# Altium PCB PCB1.PcbDoc
Units mm, origin at the board's own origin, x right, y up, seen from the top; angles counter-clockwise.
Board outline 30 x 30 mm, 2 copper layers (Top Layer, Bottom Layer); 11 components, 7 nets, 26 pads, 31 vias.
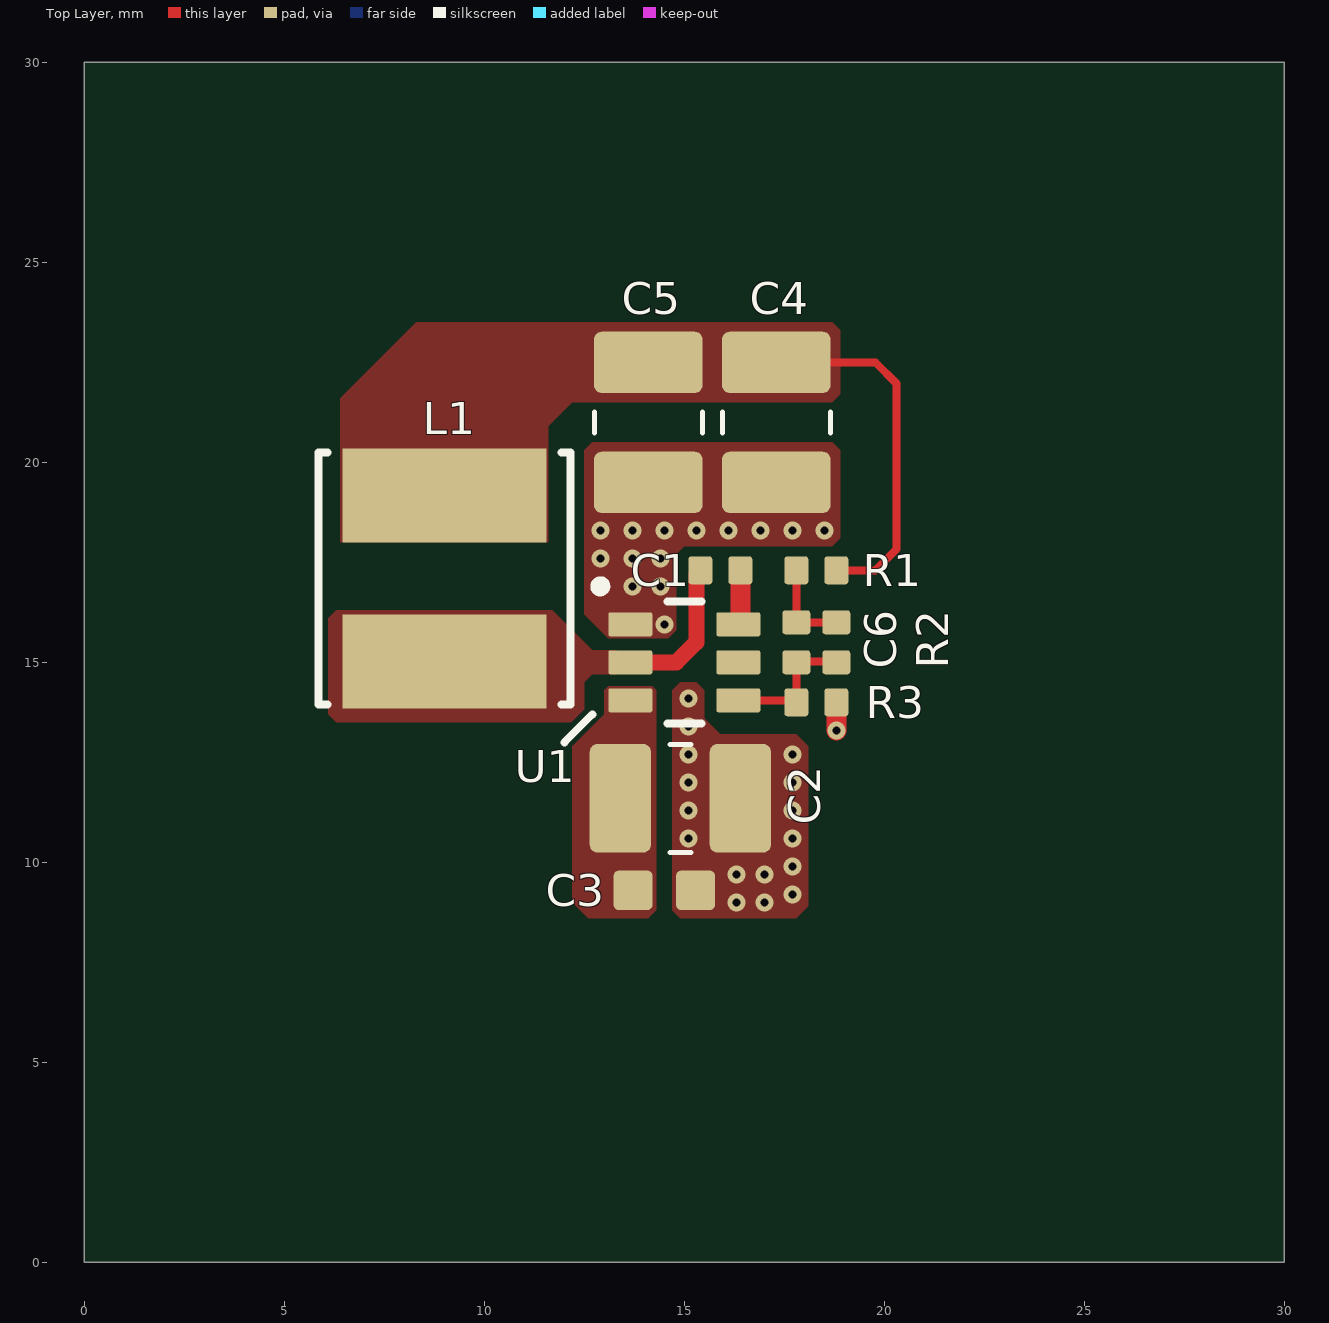
[diagram p0: Top Layer view]
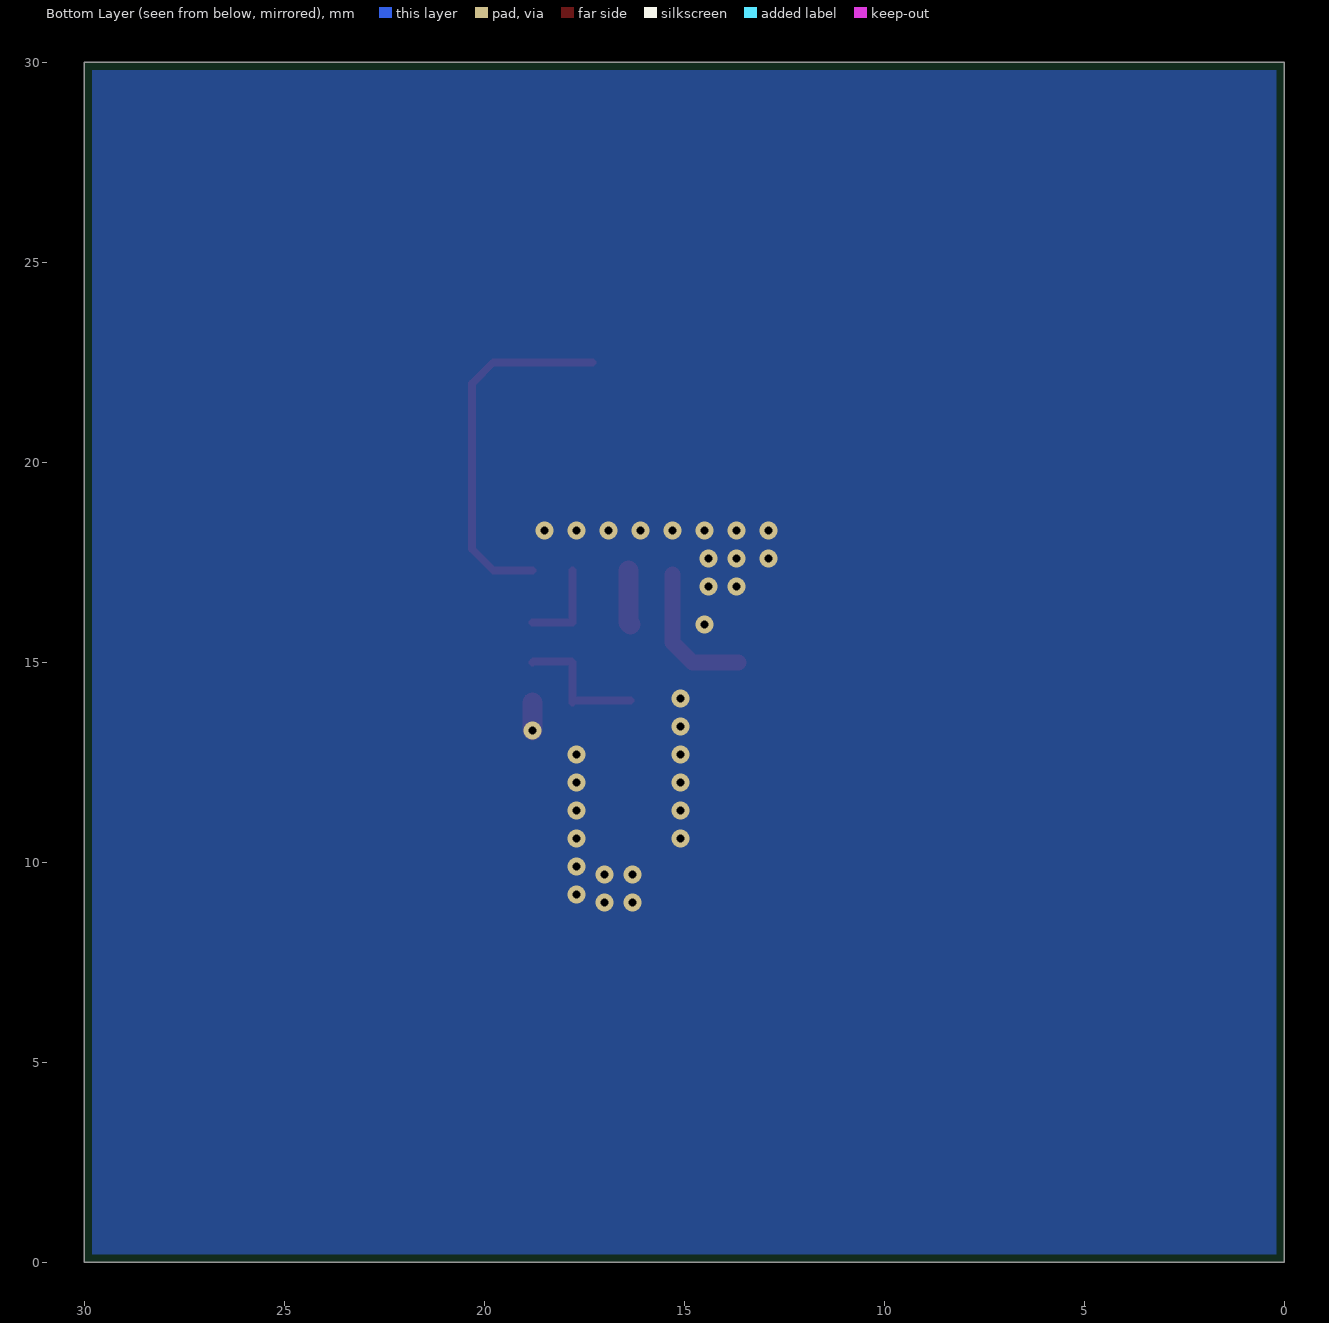
[diagram p1: Bottom Layer view, seen from below]
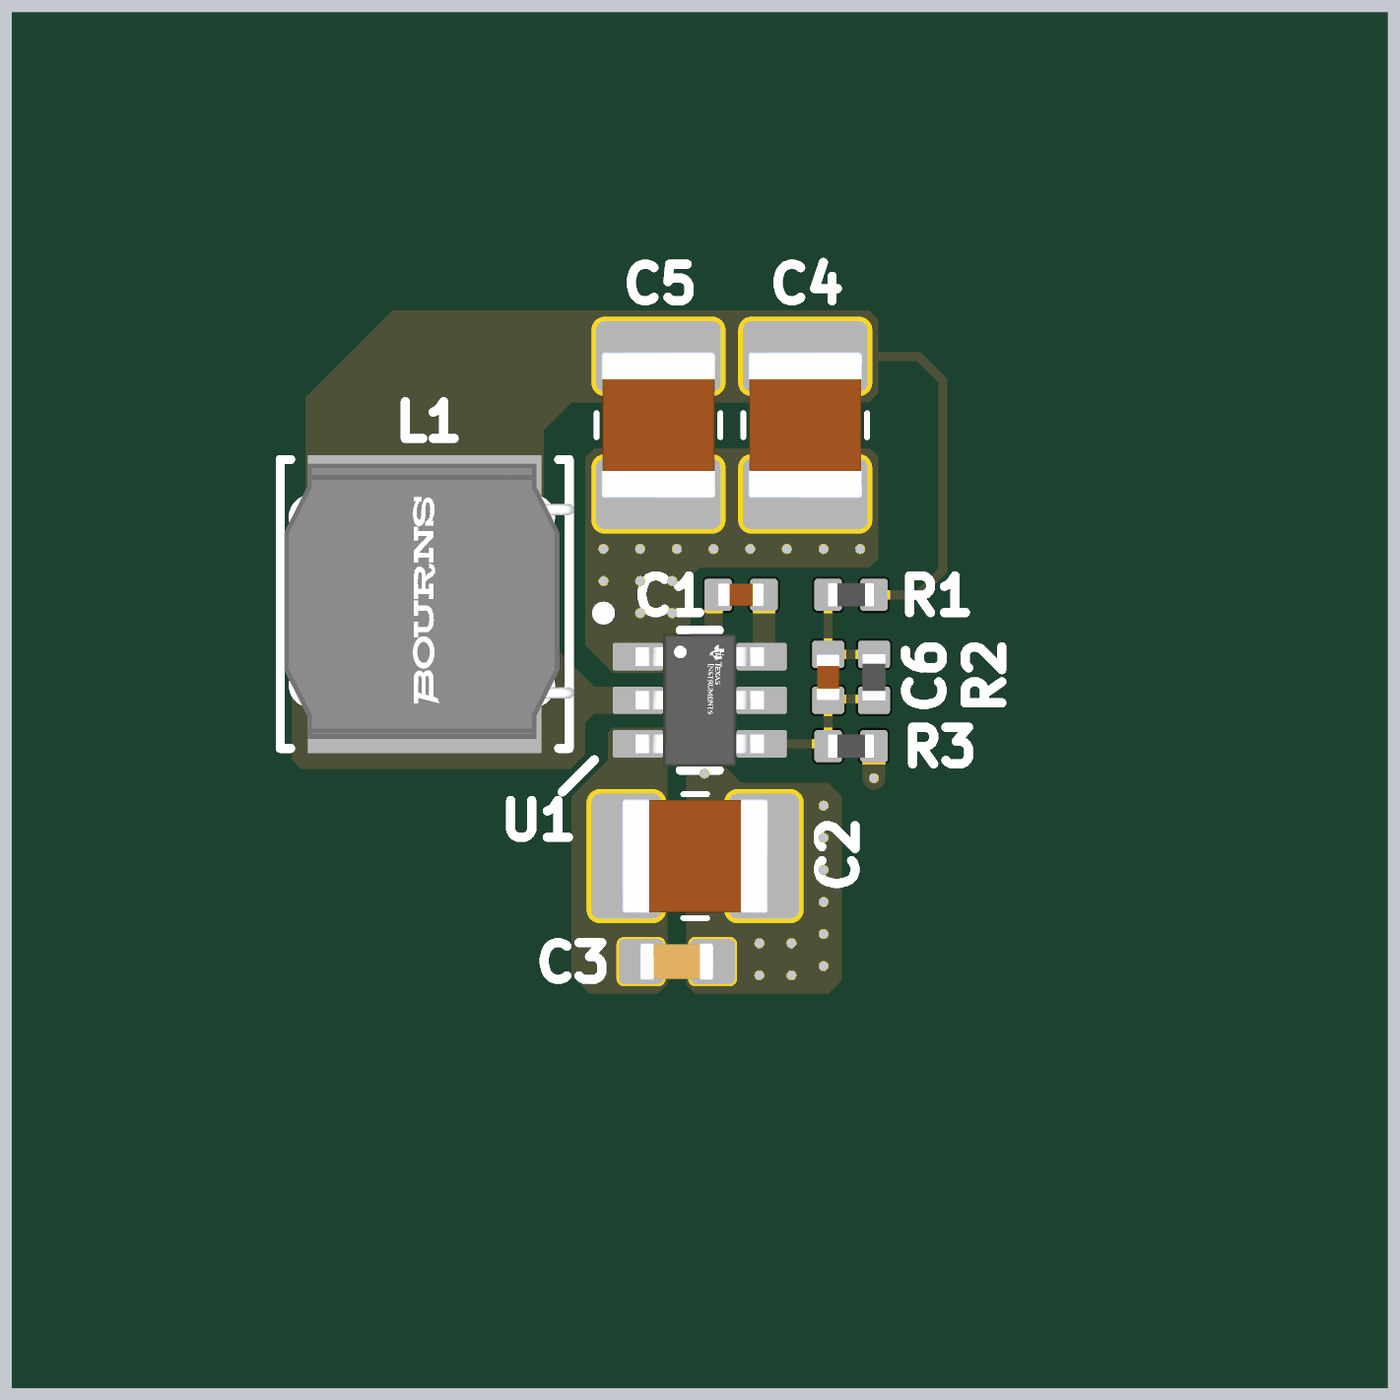
[diagram p2: 3D render of the assembled board from above, using the file's embedded part models]

## Layer stack, top to bottom
Top Solder: solder mask 0.0102, Solder Resist, Dk 3.5
Top Layer: signal copper 0.0356
Dielectric 1: dielectric 0.32, FR-4, Dk 4.8
Bottom Layer: signal copper 0.0356
Bottom Solder: solder mask 0.0102, Solder Resist, Dk 3.5

## Board outline
0,0 0,30 30,30 30,0

## Design rules (kind name [scope] priority, off if disabled: settings)
BoardOutlineClearance [All] p1: gap=0.2 ignorepadtopadclearanceinfootprint=FALSE
Clearance [All] p1: gap=0.127 ignorepadtopadclearanceinfootprint=FALSE except(0.102: Arc-Text Track-Text SMDPad-Text THPad-Text Fill-Text Poly-Text Region-Text Text-Text; 0.12: Arc-Arc Arc-Track Track-Track; 0.15: Arc-SMDPad Arc-Via Track-SMDPad Track-Via SMDPad-SMDPad SMDPad-THPad THPad-THPad Fill-Fill Fill-Poly Fill-Region Poly-Poly Poly-Region Region-Region; 0.2: Arc-THPad Track-THPad; 0.25: Arc-Hole Track-Hole SMDPad-Hole THPad-Fill THPad-Poly THPad-Region THPad-Hole Via-Hole Fill-Hole Poly-Hole Region-Hole Text-Hole)
DiffPairsRouting [InDifferentialPairClass('USBCONN_DIFF')] p1: maxlimit=0.127 minlimit=0.127 mostfreqgap=0.127 toplayer_minwidth=0.2 toplayer_maxwidth=0.2 toplayer_prefwidth=0.2 bottomlayer_minwidth=0.2 bottomlayer_maxwidth=0.2 bottomlayer_prefwidth=0.2 impedanceprofiledriven=TRUE maxuncoupledlength=12.7
HoleSize [All] p1: absolutevalues=TRUE maxlimit=6.3 minlimit=0.2 maxpercent=80.000 minpercent=20.000
HoleToHoleClearance [All] p1: gap=0.25 allowstackedmicrovias=FALSE
MinimumAnnularRing [All] p1: minimumring=0.12
MinimumSolderMaskSliver [All] p1: minsoldermaskwidth=0.1
PlaneClearance [All] p1: clearance=0.15
PlaneConnect PlaneConnectPowerPads [InPadClass('PowerPads')] p1: planeconnectstyle=Direct reliefexpansion=0.508 reliefentries=4 reliefconductorwidth=0.254 reliefairgap=0.254
PlaneConnect [All] p2: planeconnectstyle=Direct reliefexpansion=0.3 reliefentries=4 reliefconductorwidth=1 reliefairgap=0.102
PolygonConnect PolygonConnectPowerPads [All vs (InPadClass('PowerPads'))] p1: connectstyle=Direct reliefconductorwidth=0.254 reliefentries=4 polygonreliefangle="90 Angle" airgapwidth=0.254
PolygonConnect [All] p2: connectstyle=Direct reliefconductorwidth=0.5 reliefentries=4 polygonreliefangle="90 Angle" airgapwidth=0.102
RoutingVias [All] p1: holewidth=0.2 width=0.45 viastyle="Through Hole" minholewidth=0.2 minwidth=0.45 maxholewidth=0.2 maxwidth=0.45
SilkToSilkClearance [All] p1: silktosilkclearance=0
SilkToSolderMaskClearance [IsPad] p1: minsilkscreentomaskgap=0.102 clearancetoexposedcopper=TRUE
SolderMaskExpansion SolderMaskExpansion_1 [IsVia] p1: expansion=0.102 istentingtop=TRUE
SolderMaskExpansion [All] p2: expansion=0.075 istentingtop=FALSE
Width [All] p1: maxlimit=0.8 minlimit=0.102 preferedwidth=0.2 minimp=50.000000 maximp=50.000000 favimp=50.000000
22 further rules are at their usual default settings.

## Components (designator, comment, footprint, x,y, rotation, side; value= is the part's Value field where it differs from the comment)
C1 "100nF" 0402_Cap 15.9,17.3 r0 top
C2 "10uF" 1210_CAP 14.9,11.6 r180 top
C3 "100nF" 0603_CAP 14.5,9.3 r180 top
C4 "22uF" 1210_CAP 17.3,21 r90 top
C5 "22uF" 1210_CAP 14.1,21 r90 top
C6 "75pF" 0402_Cap 17.8,15.5 r90 top
L1 "10uH" FP-SRN6045TA-MFG 9,17.1 r90 top
R1 "0R" 0402_RES 18.3,17.3 r0 top
R2 "100K" 0402_RES 18.8,15.5 r90 top
R3 "13K3" 0402_RES 18.3,14 r180 top
U1 "TPS54302DDCR" FP-DDC0006A-MFG 15,15 r0 top

## Footprints (in the part's own frame and the unit in brackets; to place one, negate y for a bottom-side part, rotate by r counter-clockwise, add the part's x,y. Pads: shape width x height; smd on the part's side, far side on the other; paste and mask are expansions set on the pad)
0402_Cap [mm]
  rrect25% 0.6x0.7 smd paste+0 mask+0.051: 1(-0.5,0) 2(0.5,0)
  body extent -0.5,-0.25 0.5,0.25, height 0.55
0402_RES [mm]
  rrect25% 0.6x0.7 smd paste+0 mask+0.051: 1(-0.5,0) 2(0.5,0)
  body extent -0.5,-0.25 0.5,0.25, height 0.4
0603_CAP [mm]
  rrect25% 0.972x0.981 smd mask+0.051: 1(-0.78,0) 2(0.78,0)
  body extent -0.8,-0.4 0.8,0.4, height 0.9
1210_CAP [mm]
  rrect25% 1.53x2.72 smd paste+0 mask+0.102: 1(-1.5,0) 2(1.5,0)
  silkscreen extent -0.26,-1.35 0.26,1.35, body extent -1.6,-1.25 1.6,1.25, height 2.7
FP-DDC0006A-MFG [mm]
  rrect17% 1.1x0.6 smd paste+0 mask+0: 1(-1.35,0.95) 2(-1.35,0) 3(-1.35,-0.95) 4(1.35,-0.95) 5(1.35,0) 6(1.35,0.95)
  silkscreen extent -2.22,-1.53 0.43,2.02, body extent -2,-1.63 2,1.63, height 0.25
FP-SRN6045TA-MFG [mm]
  rect 2.35x5.1 smd paste+0 mask+0: 1(-2.075,0) 2(2.075,0)
  silkscreen extent -3.15,-3.15 3.15,3.15, body extent -2.94,-3.27 3.06,3.06, height 4.5

## Part data
C1: library part GCM155R71H104KE02J, "50V 100nF X7R ±10% 0402 Multilayer Ceramic Capacitors MLCC - SMD/SMT ROHS", Case Code (Imperial)=0402, Case Code (Metric)=1005, Dielectric=X7R, Dielectric Material=Ceramic, Manufacturer=Murata, Manufacturer Lifecycle Status="IN PRODUCTION", Max Operating Temperature=125°C, Min Operating Temperature=-55°C, Ratings=AEC-Q200, Supplier Part Number 1=490-14514-6-ND, Tolerance=±10%, Voltage Rating=50V, Capacitance=100nF, Case/Package=0402, Category="Ceramic Capacitors", ComponentLink1Description=https://datasheet.octopart.com:443/GCM155R71H104KE02J-Murata-datasheet-155345015.pdf?src-supplier=Newark, ComponentLink1URL=https://datasheet.octopart.com:443/GCM155R71H104KE02J-Murata-datasheet-155345015.pdf?src-supplier=Newark, ComponentLink2Description=https://datasheet.octopart.com:443/GCM155R71H104KE02J-Murata-datasheet-178519985.pdf?src-supplier=Arrow.cn, ComponentLink2URL=https://datasheet.octopart.com:443/GCM155R71H104KE02J-Murata-datasheet-178519985.pdf?src-supplier=Arrow.cn, ComponentLink3Description=https://datasheet.octopart.com:443/GCM155R71H104KE02J-Murata-datasheet-141266224.pdf?src-supplier=Ciiva, ComponentLink3URL=https://datasheet.octopart.com:443/GCM155R71H104KE02J-Murata-datasheet-141266224.pdf?src-supplier=Ciiva, ComponentLink4Description=https://datasheet.octopart.com:443/GCM155R71H104KE02J-Murata-datasheet-140656751.pdf?src-supplier=Ciiva, ComponentLink4URL=https://datasheet.octopart.com:443/GCM155R71H104KE02J-Murata-datasheet-140656751.pdf?src-supplier=Ciiva, ComponentLink5Description=https://datasheet.octopart.com:443/GCM155R71H104KE02J-Murata-datasheet-138716456.pdf?src-supplier=Ciiva, ComponentLink5URL=https://datasheet.octopart.com:443/GCM155R71H104KE02J-Murata-datasheet-138716456.pdf?src-supplier=Ciiva, ComponentLink6Description=https://datasheet.octopart.com:443/GCM155R71H104KE02J-Murata-datasheet-77992203.pdf?src-supplier=Future+Electronics, ComponentLink6URL=https://datasheet.octopart.com:443/GCM155R71H104KE02J-Murata-datasheet-77992203.pdf?src-supplier=Future+Electronics, ComponentLink7Description=https://datasheet.octopart.com:443/GCM155R71H104KE02J-Murata-datasheet-12511495.pdf?src-supplier=TME, ComponentLink7URL=https://datasheet.octopart.com:443/GCM155R71H104KE02J-Murata-datasheet-12511495.pdf?src-supplier=TME, ComponentLink8Description=http://sigma.octopart.com:80/reach_statement/Murata-company-16.pdf?src-supplier=Compliance+Statements, ComponentLink8URL=http://sigma.octopart.com:80/reach_statement/Murata-company-16.pdf?src-supplier=Compliance+Statements, Country of Origin=Philippines, Export Control Classification Number (ECCN) Code=EAR99, Harmonized Tariff Schedule (HTS) Code=8532.24.00.20, Height=500µm, Introduction Date=2013-11-20, Length=1mm, Lifecycle Status=Production, Manufacturer Part Number=GCM155R71H104KE02J, Material=Ceramic, Mount="Surface Mount", Number of Terminals=2, Packaging="Tape & Reel (TR)", Pricing 1="1=0.1, 10=0.034, 50=0.0226, 100=0.0193, 500=0.01374, 1000=0.01205, 2500=0.01027, 5000=0.0092 (USD)", REACH SVHC=Yes, RoHS=Compliant, Schedule B="8532240020, 8532240020|8532240020, 8532240020|8532240020|8532240020, 8532240020|8532240020|8532240020|8532240020", Stock 1=13930662, Supplier 1=DigiKey, Termination=SMD/SMT, Voltage Rating (DC)=50V, Weight=6.010099mg, Width=500µm
C2: library part GCM32EC71H106KA03L, "50V 10uF X7S ±10% 1210 Multilayer Ceramic Capacitors MLCC - SMD/SMT ROHS", Capacitance=10µF, Case Code (Imperial)=1210, Case Code (Metric)=3225, Dielectric=X7S, Dielectric Material=Ceramic, Manufacturer=Murata, Manufacturer Lifecycle Status="IN PRODUCTION", Manufacturer Package Identifier="1210 (3225 Metric)", Max Operating Temperature=125°C, Min Operating Temperature=-55°C, Ratings=AEC-Q200, Supplier Part Number 1=490-14536-1-ND, Tolerance=±10%, Voltage Rating=50V, Case/Package=1210, Category="Ceramic Capacitors", ComponentLink1Description=https://datasheet.octopart.com:443/GCM32EC71H106KA03L-Murata-datasheet-96711494.pdf?src-supplier=element14+APAC, ComponentLink1URL=https://datasheet.octopart.com:443/GCM32EC71H106KA03L-Murata-datasheet-96711494.pdf?src-supplier=element14+APAC, ComponentLink2Description=https://datasheet.octopart.com:443/GCM32EC71H106KA03L-Murata-datasheet-141269272.pdf?src-supplier=Ciiva, ComponentLink2URL=https://datasheet.octopart.com:443/GCM32EC71H106KA03L-Murata-datasheet-141269272.pdf?src-supplier=Ciiva, ComponentLink3Description=https://datasheet.octopart.com:443/GCM32EC71H106KA03L-Murata-datasheet-140661459.pdf?src-supplier=Ciiva, ComponentLink3URL=https://datasheet.octopart.com:443/GCM32EC71H106KA03L-Murata-datasheet-140661459.pdf?src-supplier=Ciiva, ComponentLink4Description=https://datasheet.octopart.com:443/GCM32EC71H106KA03L-Murata-datasheet-138720471.pdf?src-supplier=Ciiva, ComponentLink4URL=https://datasheet.octopart.com:443/GCM32EC71H106KA03L-Murata-datasheet-138720471.pdf?src-supplier=Ciiva, ComponentLink5Description=https://datasheet.octopart.com:443/GCM32EC71H106KA03L-Murata-datasheet-12511495.pdf?src-supplier=TME, ComponentLink5URL=https://datasheet.octopart.com:443/GCM32EC71H106KA03L-Murata-datasheet-12511495.pdf?src-supplier=TME, ComponentLink6Description=http://sigma.octopart.com:80/reach_statement/Murata-company-16.pdf?src-supplier=Compliance+Statements, ComponentLink6URL=http://sigma.octopart.com:80/reach_statement/Murata-company-16.pdf?src-supplier=Compliance+Statements, Country of Origin="Japan, Philippines", Depth=2.5mm, Export Control Classification Number (ECCN) Code=EAR99, Harmonized Tariff Schedule (HTS) Code=8532.24.00.20, Height=2.5mm, Introduction Date=2013-11-20, Length=3.2mm, Lifecycle Status=Production, Manufacturer Part Number=GCM32EC71H106KA03L, Material=Ceramic, Mount="Surface Mount", Number of Terminals=2, Pricing 1="1=0.9, 10=0.569, 50=0.4396, 100=0.3997, 500=0.33218 (USD)", REACH SVHC=Yes, RoHS=Compliant, Schedule B="8532240020, 8532240020|8532240020, 8532240020|8532240020|8532240020, 8532240020|8532240020|8532240020|8532240020", Stock 1=65390, Supplier 1=DigiKey, Termination=SMD/SMT, Voltage Rating (DC)=50V, Weight=109.99615mg, Width=2.5mm
C3: library part GCJ188R71H104KA12D, "50V 100nF X7R ±10% 0603 Multilayer Ceramic Capacitors MLCC - SMD/SMT ROHS", Case Code (Imperial)=0603, Case Code (Metric)=1608, Dielectric=X7R, Dielectric Material=Ceramic, Manufacturer=Murata, Manufacturer Lifecycle Status="IN PRODUCTION", Max Operating Temperature=125°C, Min Operating Temperature=-55°C, Ratings=AEC-Q200, Supplier Part Number 1=490-5798-1-ND, Tolerance=±10%, Voltage Rating=50V, Capacitance=100nF, Case/Package=0603, Category="Ceramic Capacitors", ComponentLink1Description=https://datasheet.octopart.com:443/GCJ188R71H104KA12D-Murata-datasheet-68586835.pdf?src-supplier=Newark, ComponentLink1URL=https://datasheet.octopart.com:443/GCJ188R71H104KA12D-Murata-datasheet-68586835.pdf?src-supplier=Newark, ComponentLink2Description=https://datasheet.octopart.com:443/GCJ188R71H104KA12D-Murata-datasheet-140654765.pdf?src-supplier=Ciiva, ComponentLink2URL=https://datasheet.octopart.com:443/GCJ188R71H104KA12D-Murata-datasheet-140654765.pdf?src-supplier=Ciiva, ComponentLink3Description=https://datasheet.octopart.com:443/GCJ188R71H104KA12D-Murata-datasheet-138714437.pdf?src-supplier=Ciiva, ComponentLink3URL=https://datasheet.octopart.com:443/GCJ188R71H104KA12D-Murata-datasheet-138714437.pdf?src-supplier=Ciiva, ComponentLink4Description=https://datasheet.octopart.com:443/GCJ188R71H104KA12D-Murata-datasheet-165611796.pdf?src-supplier=TME, ComponentLink4URL=https://datasheet.octopart.com:443/GCJ188R71H104KA12D-Murata-datasheet-165611796.pdf?src-supplier=TME, ComponentLink5Description=https://datasheet.octopart.com:443/GCJ188R71H104KA12D-Murata-datasheet-12524712.pdf?src-supplier=Future+Electronics, ComponentLink5URL=https://datasheet.octopart.com:443/GCJ188R71H104KA12D-Murata-datasheet-12524712.pdf?src-supplier=Future+Electronics, ComponentLink6Description=https://datasheet.octopart.com/GCJ188R71H104KA12D-Murata-datasheet-14405607.pdf, ComponentLink6URL=https://datasheet.octopart.com/GCJ188R71H104KA12D-Murata-datasheet-14405607.pdf, ComponentLink7Description=http://sigma.octopart.com:80/reach_statement/Murata-company-16.pdf?src-supplier=Compliance+Statements, ComponentLink7URL=http://sigma.octopart.com:80/reach_statement/Murata-company-16.pdf?src-supplier=Compliance+Statements, Country of Origin="Japan, Philippines", Depth=800µm, Export Control Classification Number (ECCN) Code=EAR99, Features="Soft Termination", Harmonized Tariff Schedule (HTS) Code=8532.24.00.20, Height=800µm, Introduction Date=2012-05-07, Lead Free="Lead Free", Length=1.6mm, Lifecycle Status=Production, Manufacturer Part Number=GCJ188R71H104KA12D, Material=Ceramic, Mount="Surface Mount", Number of Terminals=2, Packaging="Cut Tape", Pricing 1="1=0.13, 10=0.073, 50=0.0508, 100=0.044, 500=0.0327, 1000=0.02922 (USD)", Radiation Hardening=No, REACH SVHC=Yes, RoHS=Compliant, Schedule B="8532240020, 8532240020|8532240020, 8532240020|8532240020|8532240020, 8532240020|8532240020|8532240020|8532240020", Stock 1=938408, Supplier 1=DigiKey, Termination=SMD/SMT, Voltage Rating (DC)=50V, Width=800µm
C4 C5: library part GRM32ER71E226KE15L, "25V 22uF X7R ±10% 1210 Multilayer Ceramic Capacitors MLCC - SMD/SMT ROHS", Capacitance=22µF, Case Code (Imperial)=1210, Case Code (Metric)=3225, Color=Black, Current Rating=3A, Dielectric=X7R, Dielectric Material=Ceramic, Manufacturer=Murata, Manufacturer Lifecycle Status="IN PRODUCTION", Max Operating Temperature=125°C, Min Operating Temperature=-55°C, Supplier Part Number 1=490-5313-1-ND, Tolerance=±10%, Voltage=25V, Case/Package=1210, Category="Ceramic Capacitors", ComponentLink1Description=https://datasheet.octopart.com:443/GRM32ER71E226KE15L-Murata-datasheet-141422401.pdf?src-supplier=Upverter, ComponentLink1URL=https://datasheet.octopart.com:443/GRM32ER71E226KE15L-Murata-datasheet-141422401.pdf?src-supplier=Upverter, ComponentLink2Description=https://datasheet.octopart.com:443/GRM32ER71E226KE15L-Murata-datasheet-12536533.pdf?src-supplier=Factory+Futures, ComponentLink2URL=https://datasheet.octopart.com:443/GRM32ER71E226KE15L-Murata-datasheet-12536533.pdf?src-supplier=Factory+Futures, ComponentLink3Description=https://datasheet.octopart.com:443/GRM32ER71E226KE15L-Murata-datasheet-62317415.pdf?src-supplier=element14+APAC, ComponentLink3URL=https://datasheet.octopart.com:443/GRM32ER71E226KE15L-Murata-datasheet-62317415.pdf?src-supplier=element14+APAC, ComponentLink4Description=https://datasheet.octopart.com:443/GRM32ER71E226KE15L-Murata-datasheet-14713250.pdf?src-supplier=element14+APAC, ComponentLink4URL=https://datasheet.octopart.com:443/GRM32ER71E226KE15L-Murata-datasheet-14713250.pdf?src-supplier=element14+APAC, ComponentLink5Description=https://datasheet.octopart.com:443/GRM32ER71E226KE15L-Murata-datasheet-141281608.pdf?src-supplier=Geoflip, ComponentLink5URL=https://datasheet.octopart.com:443/GRM32ER71E226KE15L-Murata-datasheet-141281608.pdf?src-supplier=Geoflip, ComponentLink6Description=https://datasheet.octopart.com:443/GRM32ER71E226KE15L-Murata-datasheet-8814637.pdf?src-supplier=Newark, ComponentLink6URL=https://datasheet.octopart.com:443/GRM32ER71E226KE15L-Murata-datasheet-8814637.pdf?src-supplier=Newark, ComponentLink7Description=https://datasheet.octopart.com:443/GRM32ER71E226KE15L-Murata-datasheet-14403038.pdf?src-supplier=Future+Electronics, ComponentLink7URL=https://datasheet.octopart.com:443/GRM32ER71E226KE15L-Murata-datasheet-14403038.pdf?src-supplier=Future+Electronics, ComponentLink8Description=https://datasheet.octopart.com:443/GRM32ER71E226KE15L-Murata-datasheet-22122223.pdf?src-supplier=Future+Electronics, ComponentLink8URL=https://datasheet.octopart.com:443/GRM32ER71E226KE15L-Murata-datasheet-22122223.pdf?src-supplier=Future+Electronics, ComponentLink9Description=https://datasheet.octopart.com:443/GRM32ER71E226KE15L-Murata-datasheet-165579666.pdf?src-supplier=TME, ComponentLink9URL=https://datasheet.octopart.com:443/GRM32ER71E226KE15L-Murata-datasheet-165579666.pdf?src-supplier=TME, ComponentLink10Description=https://datasheet.octopart.com:443/GRM32ER71E226KE15L-Murata-datasheet-59876780.pdf?src-supplier=TME, ComponentLink10URL=https://datasheet.octopart.com:443/GRM32ER71E226KE15L-Murata-datasheet-59876780.pdf?src-supplier=TME, ComponentLink11Description=https://datasheet.octopart.com:443/GRM32ER71E226KE15L-Murata-datasheet-140709638.pdf?src-supplier=Ciiva, ComponentLink11URL=https://datasheet.octopart.com:443/GRM32ER71E226KE15L-Murata-datasheet-140709638.pdf?src-supplier=Ciiva, ComponentLink12Description=https://datasheet.octopart.com:443/GRM32ER71E226KE15L-Murata-datasheet-138747041.pdf?src-supplier=Ciiva, ComponentLink12URL=https://datasheet.octopart.com:443/GRM32ER71E226KE15L-Murata-datasheet-138747041.pdf?src-supplier=Ciiva, ComponentLink13Description=https://datasheet.octopart.com/GRM32ER71E226KE15L-Murata-datasheet-12515295.pdf, ComponentLink13URL=https://datasheet.octopart.com/GRM32ER71E226KE15L-Murata-datasheet-12515295.pdf, ComponentLink14Description=https://datasheet.octopart.com/GRM32ER71E226KE15L-Murata-datasheet-12510076.pdf, ComponentLink14URL=https://datasheet.octopart.com/GRM32ER71E226KE15L-Murata-datasheet-12510076.pdf, ComponentLink15Description=https://datasheet.octopart.com/GRM32ER71E226KE15L-Murata-datasheet-11978611.pdf, ComponentLink15URL=https://datasheet.octopart.com/GRM32ER71E226KE15L-Murata-datasheet-11978611.pdf, ComponentLink16Description=https://datasheet.octopart.com/GRM32ER71E226KE15L-Murata-datasheet-10025737.pdf, ComponentLink16URL=https://datasheet.octopart.com/GRM32ER71E226KE15L-Murata-datasheet-10025737.pdf, ComponentLink17Description=https://datasheet.octopart.com/GRM32ER71E226KE15L-Murata-datasheet-8819587.pdf, ComponentLink17URL=https://datasheet.octopart.com/GRM32ER71E226KE15L-Murata-datasheet-8819587.pdf, ComponentLink18Description=http://sigma.octopart.com:80/reach_statement/Murata-company-16.pdf?src-supplier=Compliance+Statements, ComponentLink18URL=http://sigma.octopart.com:80/reach_statement/Murata-company-16.pdf?src-supplier=Compliance+Statements, Contact Material=Bronze, Contact Plating=Gold, Country of Origin=Singapore, Depth=2.5mm, Export Control Classification Number (ECCN) Code=EAR99, Gender=Male, Harmonized Tariff Schedule (HTS) Code=8532.24.00.20, Height=2.5mm, Introduction Date=2009-02-19, Lead Free="Lead Free", Lead Pitch=2.54mm, Length=3.2mm, Lifecycle Status=Production, Manufacturer Part Number=GRM32ER71E226KE15L, Material=Ceramic, Mount="Surface Mount", Number of Pins=2, Number of Terminals=2, Packaging="Cut Tape", Pricing 1="1=0.76, 10=0.477, 50=0.3648, 100=0.3303, 500=0.27204 (USD)", Radiation Hardening=No, REACH SVHC=Yes, RoHS=Compliant, Schedule B="8532240020, 8532240020|8532240020, 8532240020|8532240020|8532240020, 8532240020|8532240020|8532240020|8532240020", Stock 1=126347, Supplier 1=DigiKey, Termination=SMD/SMT, Thickness=2.5mm, Voltage Rating=25V, Voltage Rating (DC)=25V, Width=2.5mm
C6: library part GRT1555C1H750FA02D, "50V 75pF Ceramic Capacitor, Multilayer, Ceramic, 50V, 1% +Tol, 1% -Tol, C0G, 0.000075uF, Surface Mount, 1005M/0402", Case/Package=0402, Dielectric Material=C0G, Manufacturer=Murata, Manufacturer Lifecycle Status="IN PRODUCTION", Max Operating Temperature=125°C, Min Operating Temperature=-55°C, Ratings=AEC-Q200, Supplier Part Number 1=490-GRT1555C1H750FA02DCT-ND, Temperature Coefficient=30ppm/°C, Tolerance=±1%, Voltage Rating=50V, Capacitance=75pF, Category="Ceramic Capacitors", ComponentLink1Description=https://datasheet.octopart.com:443/GRT1555C1H750FA02D-Murata-datasheet-141283559.pdf?src-supplier=Geoflip, ComponentLink1URL=https://datasheet.octopart.com:443/GRT1555C1H750FA02D-Murata-datasheet-141283559.pdf?src-supplier=Geoflip, ComponentLink2Description=https://datasheet.octopart.com:443/GRT1555C1H750FA02D-Murata-datasheet-140710861.pdf?src-supplier=Ciiva, ComponentLink2URL=https://datasheet.octopart.com:443/GRT1555C1H750FA02D-Murata-datasheet-140710861.pdf?src-supplier=Ciiva, ComponentLink3Description=https://datasheet.octopart.com:443/GRT1555C1H750FA02D-Murata-datasheet-138748567.pdf?src-supplier=Ciiva, ComponentLink3URL=https://datasheet.octopart.com:443/GRT1555C1H750FA02D-Murata-datasheet-138748567.pdf?src-supplier=Ciiva, ComponentLink4Description=http://sigma.octopart.com:80/reach_statement/Murata-company-16.pdf?src-supplier=Compliance+Statements, ComponentLink4URL=http://sigma.octopart.com:80/reach_statement/Murata-company-16.pdf?src-supplier=Compliance+Statements, Height=500µm, Length=1mm, Lifecycle Status=Production, Manufacturer Part Number=GRT1555C1H750FA02D, Material=Ceramic, Mount="Surface Mount", Number of Terminals=2, Pricing 1="1=0.1, 10=0.038, 50=0.0256, 100=0.0219, 500=0.01568, 1000=0.01379, 2500=0.0118, 5000=0.0106 (USD)", REACH SVHC=Yes, RoHS=Compliant, Stock 1=3502, Supplier 1=DigiKey, Thickness=500µm, Voltage Rating (DC)=50V, Width=500µm
L1: library part SRN6045TA-100M, "Ind Power Semi-Shielded Wirewound 10uH ±20% 1MHz 15 Q-Factor Ferrite 3.2A T/R", Case/Package=2424, Current Rating=3.2A, DC Resistance (DCR)=52mΩ, Inductance=10µH, Inductance Tolerance=20%, Manufacturer=Bourns, Max Operating Temperature=125°C, Min Operating Temperature=-55°C, Ratings=AEC-Q200, Saturation Current=4.6A, Self Resonant Frequency=25MHz, Series Resistance=62.4mΩ, Supplier Part Number 1=SRN6045TA-100MCT-ND, Test Frequency=1MHz, Category="Fixed Inductors", China RoHS=Compliant, ComponentLink1Description=https://datasheet.octopart.com:443/SRN6045TA-100M-Bourns-datasheet-156155930.pdf?src-supplier=IHS, ComponentLink1URL=https://datasheet.octopart.com:443/SRN6045TA-100M-Bourns-datasheet-156155930.pdf?src-supplier=IHS, ComponentLink2Description=https://datasheet.octopart.com:443/SRN6045TA-100M-Bourns-datasheet-68554779.pdf?src-supplier=element14+APAC, ComponentLink2URL=https://datasheet.octopart.com:443/SRN6045TA-100M-Bourns-datasheet-68554779.pdf?src-supplier=element14+APAC, ComponentLink3Description=https://datasheet.octopart.com:443/SRN6045TA-100M-Bourns-datasheet-66075751.pdf?src-supplier=Newark, ComponentLink3URL=https://datasheet.octopart.com:443/SRN6045TA-100M-Bourns-datasheet-66075751.pdf?src-supplier=Newark, ComponentLink4Description=https://datasheet.octopart.com:443/SRN6045TA-100M-Bourns-datasheet-154729936.pdf?src-supplier=Electro+Sonic, ComponentLink4URL=https://datasheet.octopart.com:443/SRN6045TA-100M-Bourns-datasheet-154729936.pdf?src-supplier=Electro+Sonic, ComponentLink5Description=https://datasheet.octopart.com:443/SRN6045TA-100M-Bourns-datasheet-189440480.pdf?src-supplier=JRH+Electronics, ComponentLink5URL=https://datasheet.octopart.com:443/SRN6045TA-100M-Bourns-datasheet-189440480.pdf?src-supplier=JRH+Electronics, ComponentLink6Description=https://datasheet.octopart.com:443/SRN6045TA-100M-Bourns-datasheet-154729571.pdf?src-supplier=RS+(Formerly+Allied+Electronics), ComponentLink6URL=https://datasheet.octopart.com:443/SRN6045TA-100M-Bourns-datasheet-154729571.pdf?src-supplier=RS+(Formerly+Allied+Electronics), ComponentLink7Description=http://sigma.octopart.com:80/conflict_mineral_statement/Bourns-company-36.pdf?src-supplier=Compliance+Statements, ComponentLink7URL=http://sigma.octopart.com:80/conflict_mineral_statement/Bourns-company-36.pdf?src-supplier=Compliance+Statements, Composition=Wirewound, Contact Plating=Tin, Core Material=Ferrite, Country of Origin="Mainland China", Export Control Classification Number (ECCN) Code=EAR99, Harmonized Tariff Schedule (HTS) Code=8504.50.80.00, Height=4.2mm, Introduction Date=2016-07-20, Length=6mm, Lifecycle Status=Production, Manufacturer Part Number=SRN6045TA-100M, Max Current Rating=3.2A, Mount="Surface Mount", Number of Circuits=1, Number of Terminals=2, Packaging="Cut Tape", Pricing 1="1=0.46, 10=0.382, 100=0.3137 (USD)", Q Factor=15, REACH SVHC=Yes, Resistance=52mΩ, RMS Current (Irms)=3.2A, RoHS=Compliant, Schedule B="8504500000, 8504500000|8504500000, 8504500000|8504500000|8504500000, 8504500000|8504500000|8504500000|8504500000", Shielding=Shielded, Stock 1=8792, Supplier 1=DigiKey, Tolerance=20%, Width=6mm
R1: library part RCS04020000Z0ED, "0Ω Resistor, Jumper, 0402 [1005 Metric], Thick Film, 200 mW, 3 A, Surface Mount Device", Case Code (Imperial)=0402, Case Code (Metric)=1005, Manufacturer=Vishay, Max Current Rating=3A, Max Operating Temperature=155°C, Max Power Dissipation=200mW, Min Operating Temperature=-55°C, Ratings=AEC-Q200, Resistance=0Ω, Supplier Part Number 1=541-2877-6-ND, Tolerance=±5%, Voltage Rating=50V, Case/Package=0402, Category="Chip SMD Resistors", China RoHS=Non-Compliant, ComponentLink1Description=https://datasheet.octopart.com:443/RCS04020000Z0ED-Vishay-datasheet-176436275.pdf?src-supplier=IHS, ComponentLink1URL=https://datasheet.octopart.com:443/RCS04020000Z0ED-Vishay-datasheet-176436275.pdf?src-supplier=IHS, ComponentLink2Description=https://datasheet.octopart.com:443/RCS04020000Z0ED-Vishay-datasheet-86813749.pdf?src-supplier=Future+Electronics, ComponentLink2URL=https://datasheet.octopart.com:443/RCS04020000Z0ED-Vishay-datasheet-86813749.pdf?src-supplier=Future+Electronics, ComponentLink3Description=http://sigma.octopart.com:80/rohs_statement/Vishay-company-15.pdf?src-supplier=Compliance+Statements, ComponentLink3URL=http://sigma.octopart.com:80/rohs_statement/Vishay-company-15.pdf?src-supplier=Compliance+Statements, Composition="Thick Film", Country of Origin="Israel, Mainland China", Export Control Classification Number (ECCN) Code=EAR99, Features="Automotive AEC-Q200", Harmonized Tariff Schedule (HTS) Code=8533.21.00.30, Height=350µm, Introduction Date=2016-07-12, Length=1mm, Lifecycle Status=Production, Manufacturer Part Number=RCS04020000Z0ED, Mount="Surface Mount", Number of Terminals=2, Number of Terminations=2, Power Rating=200mW, Pricing 1="1=0.1, 10=0.032, 25=0.0268, 50=0.0232, 100=0.0204, 250=0.01728, 500=0.01532, 1000=0.01364, 5000=0.01064 (USD)", REACH SVHC=Yes, RoHS=Compliant, Stock 1=775160, Supplier 1=DigiKey, Voltage Rating (DC)=50V, Width=500µm
R2: library part RT0402BRD07100KL, "100kΩ 62.5mW Thin Film Resistor ±25ppm/℃ ±0.1% 100kΩ 0402 Chip Resistor - Surface Mount ROHS", Case Code (Imperial)=0402, Manufacturer="Yageo Group", Max Operating Temperature=155°C, Max Power Dissipation=63mW, Min Operating Temperature=-55°C, Power Rating=62.5mW, Resistance=100kΩ, Supplier Part Number 1=YAG1343CT-ND, Temperature Coefficient=25ppm/°C, Tolerance=±0.1%, Voltage Rating=50V, Case/Package=0402, Category="Chip SMD Resistors", China RoHS=Non-Compliant, ComponentLink1Description=https://datasheet.octopart.com:443/RT0402BRD07100KL-Yageo-datasheet-176402239.pdf?src-supplier=Future+Electronics, ComponentLink1URL=https://datasheet.octopart.com:443/RT0402BRD07100KL-Yageo-datasheet-176402239.pdf?src-supplier=Future+Electronics, ComponentLink2Description=https://datasheet.octopart.com:443/RT0402BRD07100KL-Yageo-datasheet-169971040.pdf?src-supplier=Future+Electronics, ComponentLink2URL=https://datasheet.octopart.com:443/RT0402BRD07100KL-Yageo-datasheet-169971040.pdf?src-supplier=Future+Electronics, ComponentLink3Description=https://datasheet.octopart.com:443/RT0402BRD07100KL-Yageo-datasheet-166250672.pdf?src-supplier=Future+Electronics, ComponentLink3URL=https://datasheet.octopart.com:443/RT0402BRD07100KL-Yageo-datasheet-166250672.pdf?src-supplier=Future+Electronics, ComponentLink4Description=https://datasheet.octopart.com:443/RT0402BRD07100KL-Yageo-datasheet-136673517.pdf?src-supplier=Future+Electronics, ComponentLink4URL=https://datasheet.octopart.com:443/RT0402BRD07100KL-Yageo-datasheet-136673517.pdf?src-supplier=Future+Electronics, ComponentLink5Description=https://datasheet.octopart.com:443/RT0402BRD07100KL-Yageo-datasheet-137700930.pdf?src-supplier=Future+Electronics, ComponentLink5URL=https://datasheet.octopart.com:443/RT0402BRD07100KL-Yageo-datasheet-137700930.pdf?src-supplier=Future+Electronics, ComponentLink6Description=https://datasheet.octopart.com:443/RT0402BRD07100KL-Yageo-datasheet-41589729.pdf?src-supplier=Future+Electronics, ComponentLink6URL=https://datasheet.octopart.com:443/RT0402BRD07100KL-Yageo-datasheet-41589729.pdf?src-supplier=Future+Electronics, ComponentLink7Description=https://datasheet.octopart.com:443/RT0402BRD07100KL-Yageo-datasheet-12594463.pdf?src-supplier=Future+Electronics, ComponentLink7URL=https://datasheet.octopart.com:443/RT0402BRD07100KL-Yageo-datasheet-12594463.pdf?src-supplier=Future+Electronics, ComponentLink8Description=https://datasheet.octopart.com:443/RT0402BRD07100KL-Yageo-datasheet-10915759.pdf?src-supplier=Future+Electronics, ComponentLink8URL=https://datasheet.octopart.com:443/RT0402BRD07100KL-Yageo-datasheet-10915759.pdf?src-supplier=Future+Electronics, ComponentLink9Description=https://datasheet.octopart.com:443/RT0402BRD07100KL-Yageo-datasheet-34924148.pdf?src-supplier=Future+Electronics, ComponentLink9URL=https://datasheet.octopart.com:443/RT0402BRD07100KL-Yageo-datasheet-34924148.pdf?src-supplier=Future+Electronics, ComponentLink10Description=https://datasheet.octopart.com:443/RT0402BRD07100KL-Yageo-datasheet-96443642.pdf?src-supplier=Upverter, ComponentLink10URL=https://datasheet.octopart.com:443/RT0402BRD07100KL-Yageo-datasheet-96443642.pdf?src-supplier=Upverter, ComponentLink11Description=https://datasheet.octopart.com:443/RT0402BRD07100KL-Yageo-Group-datasheet-188167888.pdf?src-supplier=LCSC, ComponentLink11URL=https://datasheet.octopart.com:443/RT0402BRD07100KL-Yageo-Group-datasheet-188167888.pdf?src-supplier=LCSC, ComponentLink12Description=https://datasheet.octopart.com:443/RT0402BRD07100KL-Yageo-datasheet-164439670.pdf?src-supplier=Newark, ComponentLink12URL=https://datasheet.octopart.com:443/RT0402BRD07100KL-Yageo-datasheet-164439670.pdf?src-supplier=Newark, ComponentLink13Description=https://datasheet.octopart.com:443/RT0402BRD07100KL-Yageo-Group-datasheet-141265893.pdf?src-supplier=ODG+(Origin+Data+Global), ComponentLink13URL=https://datasheet.octopart.com:443/RT0402BRD07100KL-Yageo-Group-datasheet-141265893.pdf?src-supplier=ODG+(Origin+Data+Global), ComponentLink14Description=https://datasheet.octopart.com/RT0402BRD07100KL-Yageo-datasheet-86813807.pdf, ComponentLink14URL=https://datasheet.octopart.com/RT0402BRD07100KL-Yageo-datasheet-86813807.pdf, ComponentLink15Description=http://sigma.octopart.com:80/conflict_mineral_statement/Yageo-company-3.pdf?src-supplier=Compliance+Statements, ComponentLink15URL=http://sigma.octopart.com:80/conflict_mineral_statement/Yageo-company-3.pdf?src-supplier=Compliance+Statements, ComponentLink16Description=http://sigma.octopart.com:80/rohs_statement/Yageo-company-2.pdf?src-supplier=Compliance+Statements, ComponentLink16URL=http://sigma.octopart.com:80/rohs_statement/Yageo-company-2.pdf?src-supplier=Compliance+Statements, Composition="Thin Film", Country of Origin="Mainland China", Depth=500µm, Export Control Classification Number (ECCN) Code=EAR99, Features="Moisture Resistant", Harmonized Tariff Schedule (HTS) Code=8533.21.00.30, Height=300µm, Introduction Date=2008-06-09, Lead Free="Lead Free", Length=1mm, Lifecycle Status=Production, Manufacturer Part Number=RT0402BRD07100KL, Military Standard=Not, Mount="Surface Mount", Number of Terminals=2, Number of Terminations=2, Pricing 1="1=0.1, 10=0.078, 25=0.0724, 50=0.0684, 100=0.0646, 250=0.05992, 500=0.05672, 1000=0.05377, 5000=0.04796 (USD)", REACH SVHC=Yes, RoHS=Compliant, Schedule B="8533210045, 8533210045|8533210045|8533210045|8533210045|8533210045", Stock 1=176013, Supplier 1=DigiKey, Termination=SMD/SMT, Voltage Rating (DC)=50V, Width=500µm, Working Voltage=50V
R3: library part RT0402BRD0713K3L, "13.3kΩ 63mW Thin Film Resistor ±25ppm/℃ ±0.1% 13.3kΩ 0402 Chip Resistor - Surface Mount ROHS", Case Code (Imperial)=0402, Manufacturer="Yageo Group", Max Operating Temperature=155°C, Max Power Dissipation=63mW, Min Operating Temperature=-55°C, Power Rating=62.5mW, Resistance=13.3kΩ, Supplier Part Number 1=YAG1356CT-ND, Temperature Coefficient=25ppm/°C, Tolerance=±0.1%, Voltage Rating=50V, Case/Package=0402, Category="Chip SMD Resistors", China RoHS=Non-Compliant, ComponentLink1Description=https://datasheet.octopart.com:443/RT0402BRD0713K3L-Yageo-datasheet-176402239.pdf?src-supplier=Future+Electronics, ComponentLink1URL=https://datasheet.octopart.com:443/RT0402BRD0713K3L-Yageo-datasheet-176402239.pdf?src-supplier=Future+Electronics, ComponentLink2Description=https://datasheet.octopart.com:443/RT0402BRD0713K3L-Yageo-datasheet-169971040.pdf?src-supplier=Future+Electronics, ComponentLink2URL=https://datasheet.octopart.com:443/RT0402BRD0713K3L-Yageo-datasheet-169971040.pdf?src-supplier=Future+Electronics, ComponentLink3Description=https://datasheet.octopart.com:443/RT0402BRD0713K3L-Yageo-datasheet-166250672.pdf?src-supplier=Future+Electronics, ComponentLink3URL=https://datasheet.octopart.com:443/RT0402BRD0713K3L-Yageo-datasheet-166250672.pdf?src-supplier=Future+Electronics, ComponentLink4Description=https://datasheet.octopart.com:443/RT0402BRD0713K3L-Yageo-datasheet-136673517.pdf?src-supplier=Future+Electronics, ComponentLink4URL=https://datasheet.octopart.com:443/RT0402BRD0713K3L-Yageo-datasheet-136673517.pdf?src-supplier=Future+Electronics, ComponentLink5Description=https://datasheet.octopart.com:443/RT0402BRD0713K3L-Yageo-datasheet-137700930.pdf?src-supplier=Future+Electronics, ComponentLink5URL=https://datasheet.octopart.com:443/RT0402BRD0713K3L-Yageo-datasheet-137700930.pdf?src-supplier=Future+Electronics, ComponentLink6Description=https://datasheet.octopart.com:443/RT0402BRD0713K3L-Yageo-datasheet-41589729.pdf?src-supplier=Future+Electronics, ComponentLink6URL=https://datasheet.octopart.com:443/RT0402BRD0713K3L-Yageo-datasheet-41589729.pdf?src-supplier=Future+Electronics, ComponentLink7Description=https://datasheet.octopart.com:443/RT0402BRD0713K3L-Yageo-datasheet-12594463.pdf?src-supplier=Future+Electronics, ComponentLink7URL=https://datasheet.octopart.com:443/RT0402BRD0713K3L-Yageo-datasheet-12594463.pdf?src-supplier=Future+Electronics, ComponentLink8Description=https://datasheet.octopart.com:443/RT0402BRD0713K3L-Yageo-datasheet-34924148.pdf?src-supplier=Future+Electronics, ComponentLink8URL=https://datasheet.octopart.com:443/RT0402BRD0713K3L-Yageo-datasheet-34924148.pdf?src-supplier=Future+Electronics, ComponentLink9Description=https://datasheet.octopart.com:443/RT0402BRD0713K3L-Yageo-datasheet-96443642.pdf?src-supplier=Upverter, ComponentLink9URL=https://datasheet.octopart.com:443/RT0402BRD0713K3L-Yageo-datasheet-96443642.pdf?src-supplier=Upverter, ComponentLink10Description=https://datasheet.octopart.com:443/RT0402BRD0713K3L-Yageo-datasheet-164439670.pdf?src-supplier=Newark, ComponentLink10URL=https://datasheet.octopart.com:443/RT0402BRD0713K3L-Yageo-datasheet-164439670.pdf?src-supplier=Newark, ComponentLink11Description=https://datasheet.octopart.com:443/RT0402BRD0713K3L-Yageo-Group-datasheet-141265893.pdf?src-supplier=ODG+(Origin+Data+Global), ComponentLink11URL=https://datasheet.octopart.com:443/RT0402BRD0713K3L-Yageo-Group-datasheet-141265893.pdf?src-supplier=ODG+(Origin+Data+Global), ComponentLink12Description=https://datasheet.octopart.com/RT0402BRD0713K3L-Yageo-datasheet-86813807.pdf, ComponentLink12URL=https://datasheet.octopart.com/RT0402BRD0713K3L-Yageo-datasheet-86813807.pdf, ComponentLink13Description=http://sigma.octopart.com:80/conflict_mineral_statement/Yageo-company-3.pdf?src-supplier=Compliance+Statements, ComponentLink13URL=http://sigma.octopart.com:80/conflict_mineral_statement/Yageo-company-3.pdf?src-supplier=Compliance+Statements, ComponentLink14Description=http://sigma.octopart.com:80/rohs_statement/Yageo-company-2.pdf?src-supplier=Compliance+Statements, ComponentLink14URL=http://sigma.octopart.com:80/rohs_statement/Yageo-company-2.pdf?src-supplier=Compliance+Statements, Composition="Thin Film", Country of Origin="Mainland China", Depth=500µm, Export Control Classification Number (ECCN) Code=EAR99, Features="Moisture Resistant", Harmonized Tariff Schedule (HTS) Code=8533.21.00.30, Height=300µm, Introduction Date=2008-06-09, Lead Free="Lead Free", Length=1mm, Lifecycle Status=Production, Manufacturer Part Number=RT0402BRD0713K3L, Military Standard=Not, Mount="Surface Mount", Number of Terminals=2, Number of Terminations=2, Pricing 1="1=0.1, 10=0.078, 25=0.0724, 50=0.0684, 100=0.0646, 250=0.05992, 500=0.05672, 1000=0.05377, 5000=0.04796 (USD)", REACH SVHC=Yes, RoHS=Compliant, Stock 1=4925, Supplier 1=DigiKey, Termination=SMD/SMT, Voltage Rating (DC)=50V, Width=500µm, Working Voltage=50V
U1: "Switching Regulator, Current-mode, 3A, 400kHz Switching Freq-Max, BICMOS, PDSO6", Manufacturer="Texas Instruments", Manufacturer Lifecycle Status=ACTIVE, Max Junction Temperature (Tj)=125°C, Max Supply Voltage=28V, Min Operating Temperature=-40°C, Min Supply Voltage=4.5V, Nominal Supply Current=45µA, Output Current=3A, Quiescent Current=40µA, Supplier Part Number 1=296-46237-1-ND, Switching Frequency=400kHz, Category="Voltage Regulators - Switching", ComponentLink1Description=https://sigma.octopart.com:443/180581133/technical_drawing/Texas-Instruments-TPS54302DDCR.pdf?src-supplier=Texas+Instruments, ComponentLink1URL=https://sigma.octopart.com:443/180581133/technical_drawing/Texas-Instruments-TPS54302DDCR.pdf?src-supplier=Texas+Instruments, ComponentLink2Description=https://octopart.com:443/opatz8j6/c1?t=3hrKdjC5ToyAwNev9WUgXP7fLiI3XbqhpG0VfzbDPSSAZ7tByZIukugiHfoJjeHi6tE0sSQJx4q15TZ30Ep_VF4sGaVcNmaNTS1CcRPJ23NtdklhtXX69lLE6eCXyBDSh2FQGkF8V6wgyYzAU7xR549gWF3951YplSfPBuDjsKMlU4p1uq8FGxqWFJAXnC69YCwQsXClrnaVmXrQJ8-rHygZXdVtVGj2paJZU4xF1eDzkmp4d11jMCVv2esxwiydvdHOo3sbo3IJfCj7UaSdX8Oo6XeacaYyC2Y_23x9MA2-2hZafefaBsGxGhoPZHMsIVA_vW3ZvqGvLF8CFPagPmt7ZJ-y2wdSXfDHYx8tfl76evmOo3D4Zr7duUb9cFcF-Zu-i_ZU&src-supplier=Texas+Instruments, ComponentLink2URL=https://octopart.com:443/opatz8j6/c1?t=3hrKdjC5ToyAwNev9WUgXP7fLiI3XbqhpG0VfzbDPSSAZ7tByZIukugiHfoJjeHi6tE0sSQJx4q15TZ30Ep_VF4sGaVcNmaNTS1CcRPJ23NtdklhtXX69lLE6eCXyBDSh2FQGkF8V6wgyYzAU7xR549gWF3951YplSfPBuDjsKMlU4p1uq8FGxqWFJAXnC69YCwQsXClrnaVmXrQJ8-rHygZXdVtVGj2paJZU4xF1eDzkmp4d11jMCVv2esxwiydvdHOo3sbo3IJfCj7UaSdX8Oo6XeacaYyC2Y_23x9MA2-2hZafefaBsGxGhoPZHMsIVA_vW3ZvqGvLF8CFPagPmt7ZJ-y2wdSXfDHYx8tfl76evmOo3D4Zr7duUb9cFcF-Zu-i_ZU&src-supplier=Texas+Instruments, ComponentLink3Description=https://sigma.octopart.com:443/179311906/technical_drawing/Texas-Instruments-TPS54302DDCR.pdf?src-supplier=Texas+Instruments, ComponentLink3URL=https://sigma.octopart.com:443/179311906/technical_drawing/Texas-Instruments-TPS54302DDCR.pdf?src-supplier=Texas+Instruments, ComponentLink4Description=https://sigma.octopart.com:443/159779760/technical_drawing/Texas-Instruments-TPS54302DDCR.pdf?src-supplier=Texas+Instruments, ComponentLink4URL=https://sigma.octopart.com:443/159779760/technical_drawing/Texas-Instruments-TPS54302DDCR.pdf?src-supplier=Texas+Instruments, ComponentLink5Description=https://sigma.octopart.com:443/149167535/technical_drawing/Texas-Instruments-TPS54302DDCR.pdf?src-supplier=Texas+Instruments, ComponentLink5URL=https://sigma.octopart.com:443/149167535/technical_drawing/Texas-Instruments-TPS54302DDCR.pdf?src-supplier=Texas+Instruments, ComponentLink6Description=https://sigma.octopart.com:443/49250152/technical_drawing/Texas-Instruments-TPS54302DDCR.pdf?src-supplier=Texas+Instruments, ComponentLink6URL=https://sigma.octopart.com:443/49250152/technical_drawing/Texas-Instruments-TPS54302DDCR.pdf?src-supplier=Texas+Instruments, ComponentLink7Description=https://datasheet.octopart.com:443/TPS54302DDCR-Texas-Instruments-datasheet-166241406.pdf?src-supplier=Augswan, ComponentLink7URL=https://datasheet.octopart.com:443/TPS54302DDCR-Texas-Instruments-datasheet-166241406.pdf?src-supplier=Augswan, ComponentLink8Description=https://datasheet.octopart.com:443/TPS54302DDCR-Texas-Instruments-datasheet-165804755.pdf?src-supplier=LCSC, ComponentLink8URL=https://datasheet.octopart.com:443/TPS54302DDCR-Texas-Instruments-datasheet-165804755.pdf?src-supplier=LCSC, ComponentLink9Description=https://datasheet.octopart.com:443/TPS54302DDCR-Texas-Instruments-datasheet-159590144.pdf?src-supplier=LCSC, ComponentLink9URL=https://datasheet.octopart.com:443/TPS54302DDCR-Texas-Instruments-datasheet-159590144.pdf?src-supplier=LCSC, ComponentLink10Description=https://datasheet.octopart.com:443/TPS54302DDCR-Texas-Instruments-datasheet-140571865.pdf?src-supplier=Arrow.cn, ComponentLink10URL=https://datasheet.octopart.com:443/TPS54302DDCR-Texas-Instruments-datasheet-140571865.pdf?src-supplier=Arrow.cn, ComponentLink11Description=https://datasheet.octopart.com:443/TPS54302DDCR-Texas-Instruments-datasheet-137316104.pdf?src-supplier=Future+Electronics, ComponentLink11URL=https://datasheet.octopart.com:443/TPS54302DDCR-Texas-Instruments-datasheet-137316104.pdf?src-supplier=Future+Electronics, ComponentLink12Description=http://sigma.octopart.com:80/reach_statement/Texas-Instruments-company-64.pdf?src-supplier=Compliance+Statements, ComponentLink12URL=http://sigma.octopart.com:80/reach_statement/Texas-Instruments-company-64.pdf?src-supplier=Compliance+Statements, ComponentLink13Description=http://sigma.octopart.com:80/conflict_mineral_statement/Texas-Instruments-company-63.pdf?src-supplier=Compliance+Statements, ComponentLink13URL=http://sigma.octopart.com:80/conflict_mineral_statement/Texas-Instruments-company-63.pdf?src-supplier=Compliance+Statements, Height=1.1mm, Lead Free="Lead Free", Length=2.9mm, Lifecycle Status=Production, Manufacturer Part Number=TPS54302DDCR, Max Duty Cycle=100%, Max Operating Temperature=125°C, Number of Channels=1, Number of Outputs=1, Number of Pins=6, Pricing 1="1=1.33, 10=0.968, 25=0.8772, 100=0.7766, 250=0.72872, 500=0.6998, 1000=0.6885 (USD)", RoHS=Compliant, Schedule B="8542390000, 8542390000|8542390000|8542390000|8542390000|8542390000", Stock 1=35980, Supplier 1=DigiKey, Thickness=870µm, Topology=Buck, Width=1.6mm

## Via types
v1: diameter 0.45, hole 0.2, Top Layer to Bottom Layer, tented both sides, 31 vias

## Nets (pads, with @x,y where several pads share a name; then routed paths per layer and width w, separated by ;. In a path a pad name is that pad's centre, name@x,y a point inside that pad or via, vN(x,y) a via of type N, cw(c..) or ccw(c..) an arc to the next point about the centre after c; other vN are vias at no path point)
+VBAT: C2.2 C3.2 U1.3
+VOUT: C4.2 C5.2 L1.2 R1.2 | length 9.1
  Top Layer w0.2: C4.2 19.775,22.5 20.303,21.972 20.303,17.828 19.775,17.3 R1.2
FB: C6.1 R2.1 R3.2 U1.4 | length 3.5
  Top Layer w0.2: U1.4 17.75,14.05 R3.2 C6.1 17.825,15.025 18.775,15.025 R2.1
GND: C2.1 C3.1 C4.1 C5.1 R3.1 U1.1 | length 0.7
  Top Layer w0.5: v1(18.8,13.3) R3.1
  other v1: 16.3,9 17,9 17.7,9.2 16.3,9.7 17,9.7 17.7,9.9 15.1,10.6 17.7,10.6 15.1,11.3 17.7,11.3 15.1,12 17.7,12 15.1,12.7 17.7,12.7 15.1,13.4 15.1,14.1 14.5,15.95 13.7,16.9 14.4,16.9 12.9,17.6 13.7,17.6 14.4,17.6 12.9,18.3 13.7,18.3 14.5,18.3 15.3,18.3 16.1,18.3 16.9,18.3 17.7,18.3 18.5,18.3
NetC1_2: C1.2 U1.6 | length 1.4
  Top Layer w0.5: U1.6 16.4,16 C1.2
SW: C1.1 L1.1 U1.2 | length 3.6
  Top Layer w0.4: U1.2 14.8,15 15.3,15.5 C1.1@15.3,17.2
VOUT_SENSE: C6.2 R1.1 R2.2 | length 2.3
  Top Layer w0.2: R1.1 C6.2 R2.2
pads on no net: U1.5

## Polygon pours and split planes (outlines as drawn)
GND on Top Layer "NONET_L-01_P-001" (solid, pour order 5): 14.7,8.8 14.9,8.6 17.8,8.6 18.1,8.9 18.1,12.9 17.8,13.2 15.9,13.2 15.5,13.6 15.5,14.3 15.3,14.5 14.9,14.5 14.7,14.3
+VOUT on Top Layer "NONET_L-01_P-001" (solid, pour order 4): 18.7,21.5 12.2,21.5 11.6,20.9 11.6,18 6.4,18 6.4,21.6 8.3,23.5 18.7,23.5 18.9,23.3 18.9,21.7
GND on Top Layer "NONET_L-01_P-001" (solid, pour order 3): 18.7,20.5 12.7,20.5 12.5,20.3 12.5,16.2 13.1,15.6 14.6,15.6 14.8,15.8 14.8,17.7 15,17.9 18.7,17.9 18.9,18.1 18.9,20.3
SW on Top Layer "NONET_L-01_P-001" (solid, pour order 1): 14.2,15.3 12.7,15.3 11.7,16.3 6.3,16.3 6.1,16.1 6.1,13.7 6.3,13.5 12.175,13.5 12.5,13.825 12.5,14.5 12.7,14.7 14.2,14.7
+VBAT on Top Layer "NONET_L-01_P-001" (solid, pour order 2): 14.2,14.4 14.3,14.3 14.3,8.8 14.1,8.6 12.6,8.6 12.2,9 12.2,12.9 12.5,13.2 13,13.7 13,14.3 13.1,14.4
GND on Bottom Layer "NONET_L-01_P-001" (solid, pour order 0): 0,0 0,30 30,30 30,0

## Silkscreen, mask and mechanical layers (free items; w line width, h text height)
Top Overlay:
  lines w0.2: 12,13 12.7,13.7 ; 12.7,13.7 12.7,13.7